# Altium PCB DC-UPS-v1.0.PcbDoc (part 6 of 8)
Units mil, origin at the board's own origin, x right, y up, seen from the top; angles counter-clockwise.
Board outline 5905.51 x 3937.01 mil, 4 copper layers (Top Layer, SIG+PWR, SIG+GND, Bottom Layer), stack 62.449 mil thick; 278 components, 138 nets, 716 pads, 780 vias.
Unrouted connection lines stored in the file: 13.
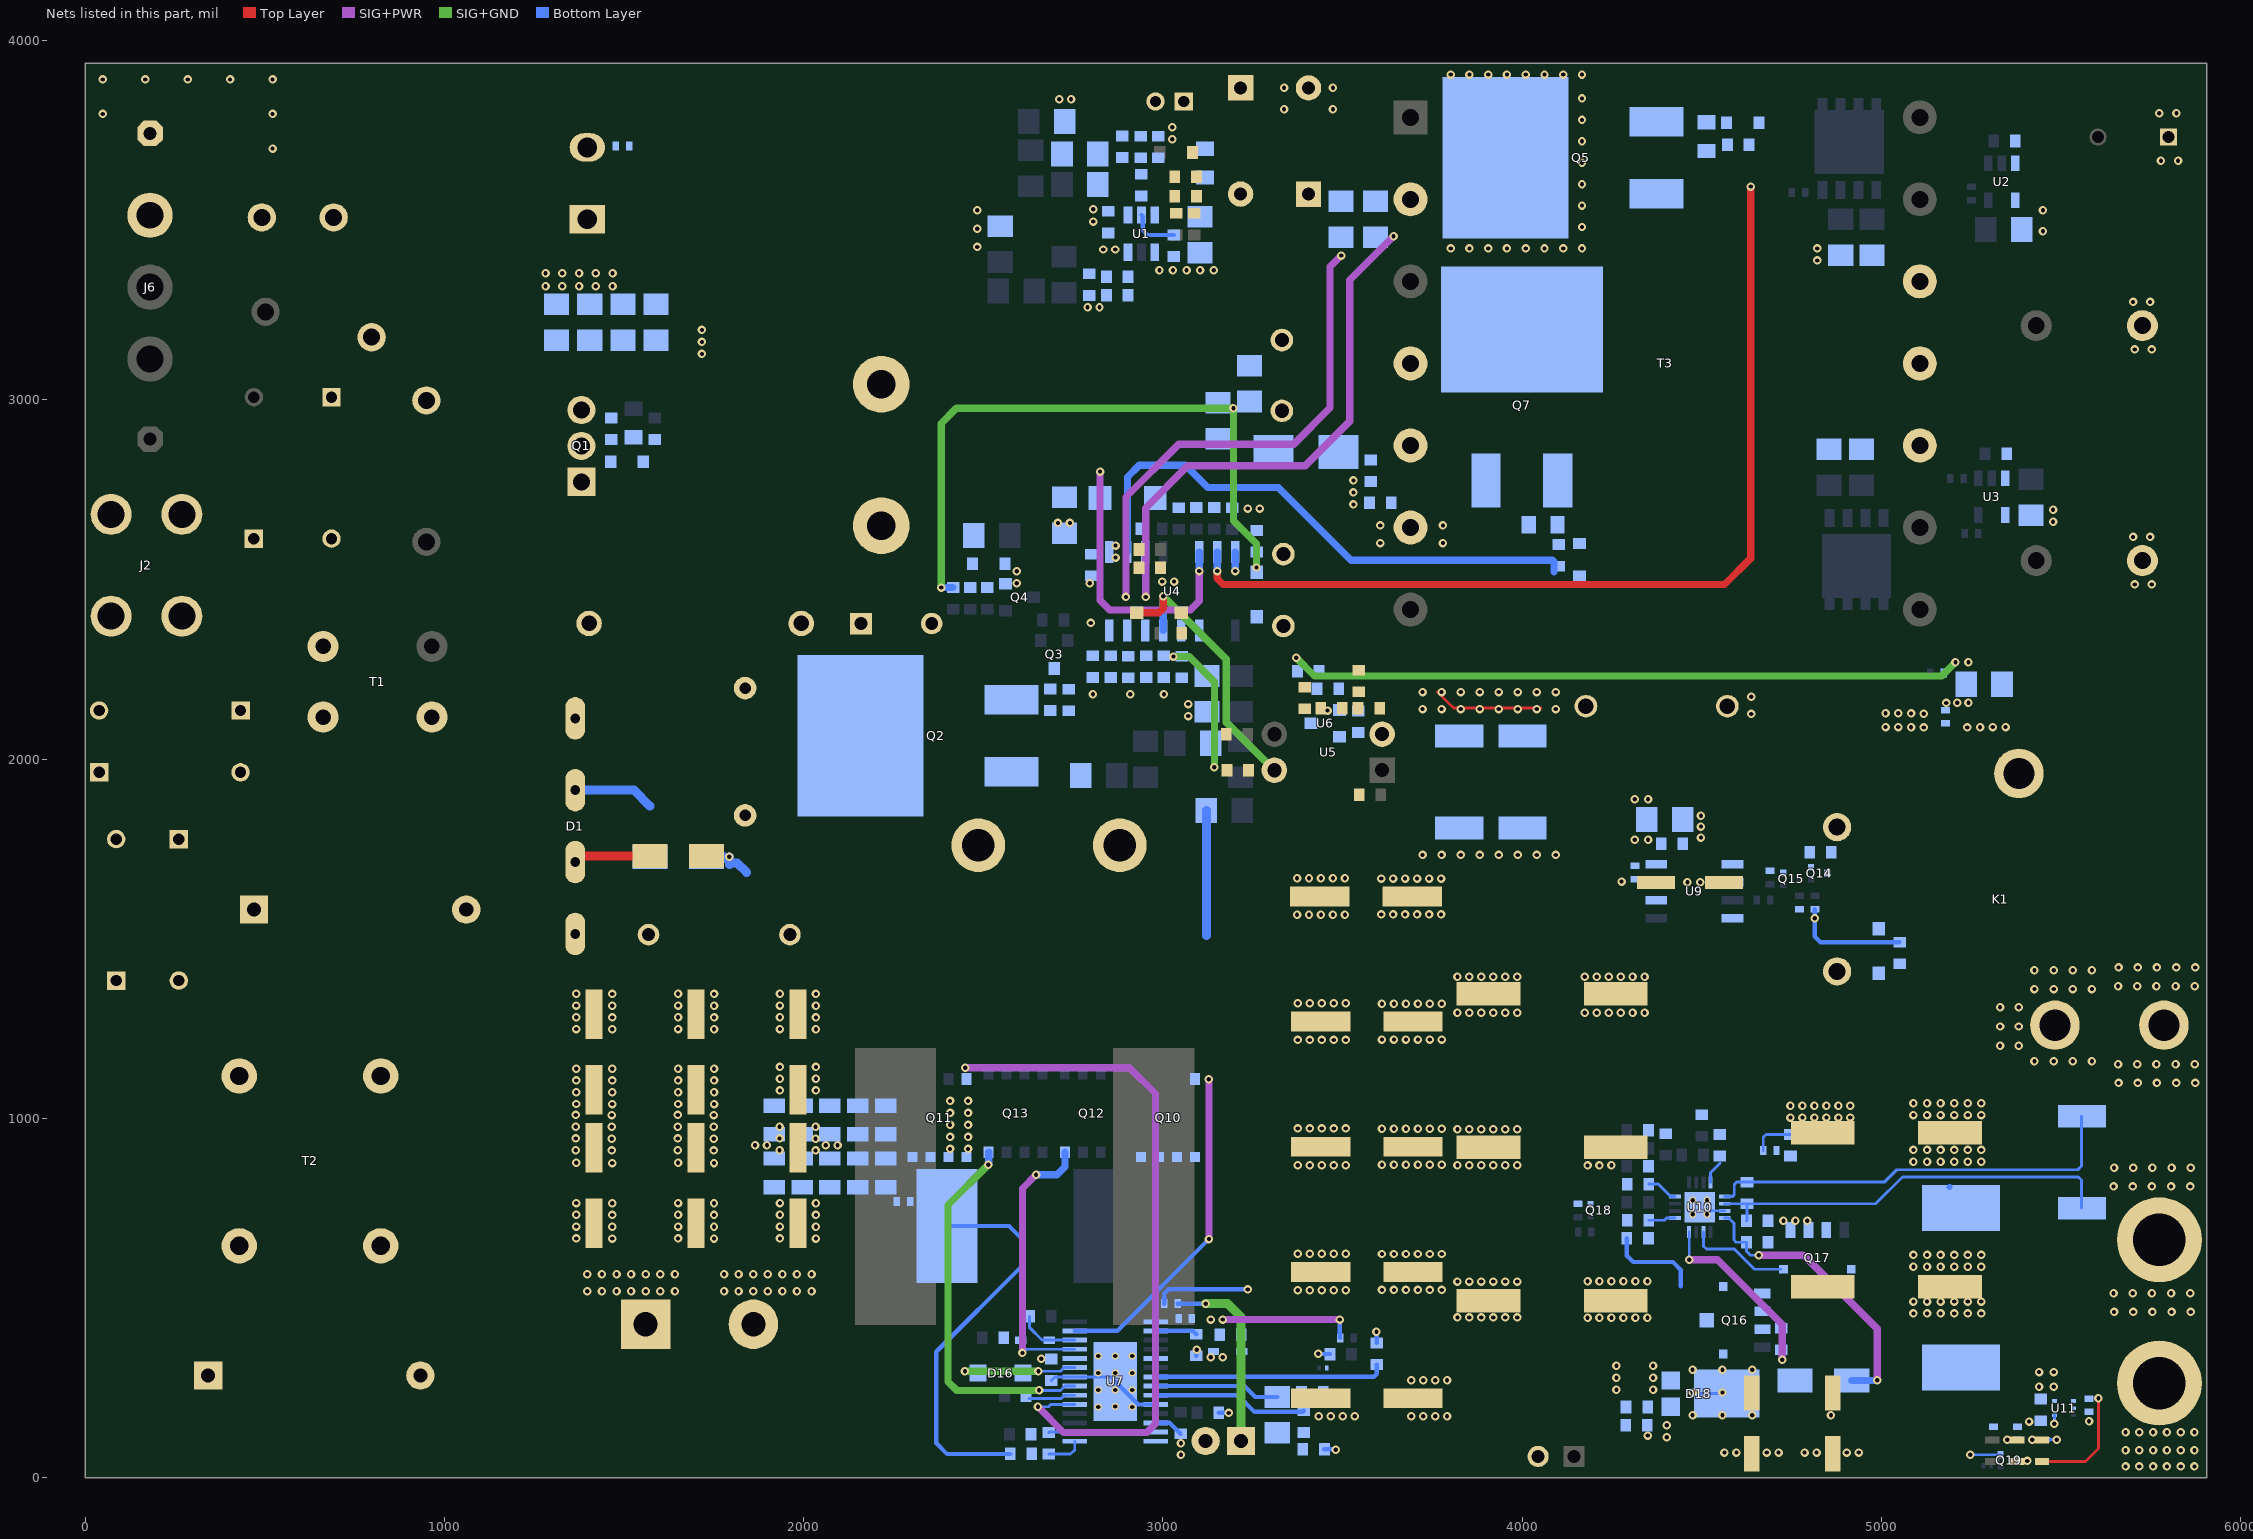
[diagram p4: the nets of this part, all layers, seen from the top]

## Part data (continued)
R71: library part CRCW06035K36FKEA, "RES SMD 5.36K OHM 1% 1/10W 0603", LCSC Part Number=C2076915, Manufacturer=Vishay, Voltage Rating (DC)=75V, ComponentLink1Description=https://datasheet.ciiva.com/3257/dcrcwe3-3257765.pdf?src-supplier=Avnet, ComponentLink1URL=https://datasheet.ciiva.com/3257/dcrcwe3-3257765.pdf?src-supplier=Avnet, ComponentLink2Description=https://datasheet.ciiva.com/5541/dcrcwe3-109170-5541375.pdf?src-supplier=Mouser, ComponentLink2URL=https://datasheet.ciiva.com/5541/dcrcwe3-109170-5541375.pdf?src-supplier=Mouser, ComponentLink3Description=https://datasheet.ciiva.com/16789/70201119-16789112.pdf?src-supplier=Allied+Electronics, ComponentLink3URL=https://datasheet.ciiva.com/16789/70201119-16789112.pdf?src-supplier=Allied+Electronics, ComponentLink4Description=https://datasheet.ciiva.com/7792/125364-7792346.pdf?src-supplier=Element14, ComponentLink4URL=https://datasheet.ciiva.com/7792/125364-7792346.pdf?src-supplier=Element14, ComponentLink5Description=https://datasheet.ciiva.com/7679/1697337-7679125.pdf?src-supplier=Element14, ComponentLink5URL=https://datasheet.ciiva.com/7679/1697337-7679125.pdf?src-supplier=Element14, ComponentLink6Description=https://datasheet.ciiva.com/7679/1697337-7679126.pdf?src-supplier=Element14, ComponentLink6URL=https://datasheet.ciiva.com/7679/1697337-7679126.pdf?src-supplier=Element14, ComponentLink7Description=https://datasheet.ciiva.com/22707/1697337-22707754.pdf?src-supplier=Element14, ComponentLink7URL=https://datasheet.ciiva.com/22707/1697337-22707754.pdf?src-supplier=Element14, Item Type=Resistor, Lead Free=5697LeadFree, Manufacturer Part Number=CRCW06035K36FKEA, Pins=2NUMBER, Pricing="1=0.1, 10=0.017, 50=0.017, 100=0.01, 1000=0.008, 10000=0.004 (USD)", RoHS=Yes, Stock=195980, Supplier=Mouser
R72: library part RC0201FR-0728K7L, "RES 28.7K OHM 1% 1/20W 0201", LCSC Part Number=C138158, Manufacturer=Yageo, Voltage Rating=25V, ComponentLink1Description=https://www.yageo.com/upload/media/product/productsearch/datasheet/rchip/PYu-RC_Group_51_RoHS_L_11.pdf?src-supplier=Digikey, ComponentLink1URL=https://www.yageo.com/upload/media/product/productsearch/datasheet/rchip/PYu-RC_Group_51_RoHS_L_11.pdf?src-supplier=Digikey, ComponentLink2Description=http://www.yageo.com/documents/recent/PYu-RC_Group_51_RoHS_L_10.pdf?src-supplier=Digikey, ComponentLink2URL=http://www.yageo.com/documents/recent/PYu-RC_Group_51_RoHS_L_10.pdf?src-supplier=Digikey, ComponentLink3Description=http://www.yageo.com/documents/recent/PYu-RC_Group_51_RoHS_L_9.pdf?src-supplier=Digikey, ComponentLink3URL=http://www.yageo.com/documents/recent/PYu-RC_Group_51_RoHS_L_9.pdf?src-supplier=Digikey, ComponentLink4Description=https://datasheet.octopart.com/RC0201FR-0728K7L-Yageo-datasheet-164759695.pdf?src-supplier=Future+Electronics, ComponentLink4URL=https://datasheet.octopart.com/RC0201FR-0728K7L-Yageo-datasheet-164759695.pdf?src-supplier=Future+Electronics, Item Type=Resistors, Manufacturer Part Number=RC0201FR-0728K7L, Pricing="1=0.104, 25=0.015, 100=0.008, 250=0.007, 500=0.006 (USD)", RoHS=Yes, Stock=10000, Supplier=Avnet
R75 R77 R87: library part RC0402FR-0710KL, "RES 10K OHM 1% 1/16W 0402", Case Code (Imperial)=0402, Case Code (Metric)=1005, LCSC Part Number=C60490, Manufacturer=Yageo, Max Operating Temperature=155°C, Max Power Dissipation=63mW, Min Operating Temperature=-55°C, Power Rating=62.5mW, Resistance=10kR, Resistance Tolerance=1%, Resistor Type="Thick Film", Supplier Part Number 1=603-RC0402FR-0710KL, Temperature Coefficient=100ppm/°C, Voltage Rating=50V, Case/Package=0402, Category="Chip SMD Resistors", ComponentLink1Description=https://datasheet.ciiva.com/7660/38568-7660787.pdf?src-supplier=Element14, ComponentLink1URL=https://datasheet.ciiva.com/7660/38568-7660787.pdf?src-supplier=Element14, ComponentLink2Description=https://datasheet.ciiva.com/7849/1686128-7849814.pdf?src-supplier=Element14, ComponentLink2URL=https://datasheet.ciiva.com/7849/1686128-7849814.pdf?src-supplier=Element14, ComponentLink3Description=https://datasheet.ciiva.com/7983/1018594-7983486.pdf?src-supplier=Element14, ComponentLink3URL=https://datasheet.ciiva.com/7983/1018594-7983486.pdf?src-supplier=Element14, ComponentLink4Description=https://datasheet.ciiva.com/22747/1018594-22747512.pdf?src-supplier=Element14, ComponentLink4URL=https://datasheet.ciiva.com/22747/1018594-22747512.pdf?src-supplier=Element14, ComponentLink5Description=https://datasheet.ciiva.com/12667/pyu-rc0402-51-rohs-l-6-r-12667067.pdf?src-supplier=Mouser, ComponentLink5URL=https://datasheet.ciiva.com/12667/pyu-rc0402-51-rohs-l-6-r-12667067.pdf?src-supplier=Mouser, ComponentLink6Description=https://datasheet.ciiva.com/7849/1784430-7849813.pdf?src-supplier=Element14, ComponentLink6URL=https://datasheet.ciiva.com/7849/1784430-7849813.pdf?src-supplier=Element14, ComponentLink7Description=https://datasheet.ciiva.com/7849/1784430-7849815.pdf?src-supplier=Element14, ComponentLink7URL=https://datasheet.ciiva.com/7849/1784430-7849815.pdf?src-supplier=Element14, Construction=Rectangular, Depth=0.5mm, Features="Moisture Resistant", Height=0.32mm, Item Type=Resistor, Lead Free="Lead Free", Lead Pitch=0.2mm, Length=1mm, Manufacturer Part Number=RC0402FR-0710KL, Military Standard=Not, Number of Pins=2, Number of Terminations=2, Packaging="Tape and Reel", Pricing 1="1=0.10000, 10=0.01400, 50=0.01400, 100=0.00500, 1000=0.00300, 10000=0.00200 (USD)", REACH SVHC="No SVHC", RoHS=Yes, RoHS Compliant=Yes, Series=RC, Stock 1=18648329, Supplier 1=Mouser, Termination=SMD/SMT, Tolerance=1%, Voltage Rating (DC)=50V, Width=0.5mm, Working Voltage=50V
R76 R78 R88: library part RC0402FR-07100KL, "RES 100K OHM 1% 1/16W 0402", Case Code (Imperial)=0402, Case Code (Metric)=1005, LCSC Part Number=C60491, Manufacturer=Yageo, Max Operating Temperature=155°C, Max Power Dissipation=63mW, Min Operating Temperature=-55°C, Package Quantity=1, Resistance=100kR, Resistance Tolerance=1%, Resistor Type="Thick Film", Supplier Part Number 1=603-RC0402FR-07100KL, Temperature Coefficient=100ppm/°C, Voltage Rating=50V, Case/Package=0402, Category="Chip SMD Resistors", ComponentLink1Description=https://datasheet.ciiva.com/11819/0900766b80c66297-11819452.pdf?src-supplier=RSComponents, ComponentLink1URL=https://datasheet.ciiva.com/11819/0900766b80c66297-11819452.pdf?src-supplier=RSComponents, ComponentLink2Description=https://datasheet.ciiva.com/22747/1018594-22747509.pdf?src-supplier=Element14, ComponentLink2URL=https://datasheet.ciiva.com/22747/1018594-22747509.pdf?src-supplier=Element14, ComponentLink3Description=https://datasheet.ciiva.com/2453/pyu-r-int-thick-7-2453362.pdf?src-supplier=Digi-Key, ComponentLink3URL=https://datasheet.ciiva.com/2453/pyu-r-int-thick-7-2453362.pdf?src-supplier=Digi-Key, ComponentLink4Description=https://datasheet.ciiva.com/2453/pyu-r-int-thick-7-2453363.pdf?src-supplier=Digi-Key, ComponentLink4URL=https://datasheet.ciiva.com/2453/pyu-r-int-thick-7-2453363.pdf?src-supplier=Digi-Key, ComponentLink5Description=https://datasheet.ciiva.com/2453/pyu-r-int-thick-7-2453361.pdf?src-supplier=Digi-Key, ComponentLink5URL=https://datasheet.ciiva.com/2453/pyu-r-int-thick-7-2453361.pdf?src-supplier=Digi-Key, ComponentLink6Description=https://datasheet.ciiva.com/12667/pyu-rc0402-51-rohs-l-6-r-12667930.pdf?src-supplier=Mouser, ComponentLink6URL=https://datasheet.ciiva.com/12667/pyu-rc0402-51-rohs-l-6-r-12667930.pdf?src-supplier=Mouser, ComponentLink7Description=https://datasheet.ciiva.com/15189/getdatasheetpartid-323696-15189334.pdf?src-supplier=Verical, ComponentLink7URL=https://datasheet.ciiva.com/15189/getdatasheetpartid-323696-15189334.pdf?src-supplier=Verical, Construction=Rectangular, Depth=0.5mm, Features="Moisture Resistant", Height=0.016inch, Item Type=Resistor, Lead Free="Lead Free", Length=0.039inch, Manufacturer Part Number=RC0402FR-07100KL, Military Standard=Not, Number of Terminations=2, Packaging="Tape and Reel", Power Rating=63mW, Pricing 1="1=0.10000, 10=0.01200, 50=0.01200, 100=0.00500, 1000=0.00300, 2500=0.00200, 10000=0.00100 (USD)", REACH SVHC="No SVHC", RoHS=Yes, RoHS Compliant=Yes, Series=RC, Stock 1=7759549, Supplier 1=Mouser, Technology="THICK FILM", Termination=SMD/SMT, Tolerance=1%, Width=0.02inch, Working Voltage=50V
R79: library part RT0402BRD0756KL, "RES SMD 56K OHM 0.1% 1/16W 0402", LCSC Part Number=C852845, Manufacturer=Yageo, ComponentLink1Description=https://datasheet.ciiva.com/12721/pyu-rt-1-to-0-05-rohs-l-4-12721243.pdf?src-supplier=Mouser, ComponentLink1URL=https://datasheet.ciiva.com/12721/pyu-rt-1-to-0-05-rohs-l-4-12721243.pdf?src-supplier=Mouser, ComponentLink2Description=https://datasheet.ciiva.com/2582/pyu-rt-1-to-0-05-rohs-l-4-2582430.pdf?src-supplier=Digikey, ComponentLink2URL=https://datasheet.ciiva.com/2582/pyu-rt-1-to-0-05-rohs-l-4-2582430.pdf?src-supplier=Digikey, Item Type=Resistors, Manufacturer Part Number=RT0402BRD0756KL, Pricing="10000=0.0279 (USD)", RoHS=Yes, Stock=70000, Supplier="Arrow Electronics"
R80: library part RC0603FR-072KL, "RES SMD 2K OHM 1% 1/10W 0603", Case Code (Imperial)=0603, Case Code (Metric)=1608, LCSC Part Number=C105576, Manufacturer=Yageo, Max Operating Temperature=155°C, Max Power Dissipation=100mW, Min Operating Temperature=-55°C, Package Quantity=1, Resistance=2kR, Supplier Part Number 1=311-2.00KHRCT-ND, Temperature Coefficient=100ppm/°C, Tolerance=1%, Voltage Rating=50V, Working Voltage=75V, Case/Package=0603, ComponentLink1Description=http://www.farnell.com/datasheets/2167052.pdf?src-supplier=Element14, ComponentLink1URL=http://www.farnell.com/datasheets/2167052.pdf?src-supplier=Element14, ComponentLink2Description=http://documents.rs-components.com/techlib://itc_doclist_GB.htm?stockno=5050139&src-supplier=RSComponents, ComponentLink2URL=http://documents.rs-components.com/techlib://itc_doclist_GB.htm?stockno=5050139&src-supplier=RSComponents, ComponentLink3Description=http://www.yageo.com/documents/recent/PYu-RC_Group_51_RoHS_L_10.pdf?src-supplier=Digi-Key, ComponentLink3URL=http://www.yageo.com/documents/recent/PYu-RC_Group_51_RoHS_L_10.pdf?src-supplier=Digi-Key, ComponentLink4Description=http://www.mouser.com/catalog/specsheets/RC0603.pdf?src-supplier=Mouser, ComponentLink4URL=http://www.mouser.com/catalog/specsheets/RC0603.pdf?src-supplier=Mouser, Composition="Thick Film", Depth=0.8mm, Features="Moisture Resistant", Height=0.45mm, Lead Free="Lead Free", Length=1.6mm, Manufacturer Part Number=RC0603FR-072KL, Military Standard=Not, Number of Pins=2, Number of Terminations=2, Packaging="Tape and Reel", Power Rating=100mW, Pricing 1="1=0.1, 10=0.023, 100=0.0094, 1000=0.00421, 2500=0.00366 (USD)", REACH SVHC="No SVHC", Stock 1=8782961, Supplier 1=Digi-Key, Termination=SMD/SMT, Voltage Rating (DC)=50V, Width=0.031inch
R82 R86 R89: library part RT0603BRD07100KL, "RES SMD 100K OHM 0.1% 1/10W 0603", Case Code (Imperial)=0603, Case Code (Metric)=1608, LCSC Part Number=C122538, Manufacturer=Yageo, Max Operating Temperature=125°C, Max Power Dissipation=100mW, Min Operating Temperature=-55°C, Package Quantity=5000, Resistance=100kR, Supplier Part Number 1=YAG1235CT-ND, Temperature Coefficient=25ppm/°C, Tolerance=0.1%, Voltage Rating=75V, Case/Package=0603, ComponentLink1Description=http://documents.rs-components.com/techlib://itc_doclist_GB.htm?stockno=6174810&src-supplier=RSComponents, ComponentLink1URL=http://documents.rs-components.com/techlib://itc_doclist_GB.htm?stockno=6174810&src-supplier=RSComponents, Composition="Thin Film", Depth=0.8mm, Features="Moisture Resistant", Height=0.022inch, Item Type=Resistor, Lead Free="Lead Free", Length=1.6mm, Manufacturer Part Number=RT0603BRD07100KL, Military Standard=Not, Mount="Surface Mount", Number of Terminations=2, Packaging="Tape and Reel", Power Rating=100mW, Pricing 1="1=0.39, 10=0.332, 100=0.1298, 1000=0.05435, 2500=0.04982 (USD)", Stock 1=53395, Supplier 1=Digi-Key, Termination=SMD/SMT, Voltage Rating (DC)=75V, Width=0.031inch, Working Voltage=75V
R84: library part PA2512FKE7T0R01E, "RES 0.01 OHM 1% 3W 2512", LCSC Part Number=C375691, Manufacturer=Yageo, Item Type=Resistor, Manufacturer Part Number=PA2512FKE7T0R01E, Pricing="1=0.926, 25=0.703, 50=0.63, 100=0.557, 250=0.485 (USD)", RoHS=No, Stock=4000, Supplier=Avnet
R85: library part RT0603BRD0793K1L, "RES SMD 93.1KOHM 0.1% 1/10W 0603", LCSC Part Number=C705799, Manufacturer=Yageo, ComponentLink1Description=http://www.mouser.com/ds/2/447/yageodocoutput-1125656.pdf?src-supplier=Mouser, ComponentLink1URL=http://www.mouser.com/ds/2/447/yageodocoutput-1125656.pdf?src-supplier=Mouser, ComponentLink2Description=http://www.yageo.com/documents/recent/PYu-RT_1-to-0.01_RoHS_L_9.pdf?src-supplier=Digikey, ComponentLink2URL=http://www.yageo.com/documents/recent/PYu-RT_1-to-0.01_RoHS_L_9.pdf?src-supplier=Digikey, ComponentLink3Description=https://www.yageo.com/upload/media/product/productsearch/datasheet/rchip/PYu-RT_1-to-0.01_RoHS_L_12.pdf?src-supplier=Digikey, ComponentLink3URL=https://www.yageo.com/upload/media/product/productsearch/datasheet/rchip/PYu-RT_1-to-0.01_RoHS_L_12.pdf?src-supplier=Digikey, ComponentLink4Description=https://datasheet.octopart.com/RT0603BRD0793K1L-Yageo-datasheet-166250672.pdf?src-supplier=Future+Electronics, ComponentLink4URL=https://datasheet.octopart.com/RT0603BRD0793K1L-Yageo-datasheet-166250672.pdf?src-supplier=Future+Electronics, Item Type=Resistors, Manufacturer Part Number=RT0603BRD0793K1L, Pricing="5000=0.0247, 10000=0.0245 (USD)", RoHS=Yes, Stock=5000, Supplier="Arrow Electronics"
R91 R97: library part RC0402FR-071K5L, "RES 1.5K OHM 1% 1/16W 0402", Case Code (Imperial)=0402, Case Code (Metric)=1005, LCSC Part Number=C114759, Manufacturer=Yageo, Max Operating Temperature=155°C, Max Power Dissipation=63mW, Min Operating Temperature=-55°C, Package Quantity=1, Power Rating=62.5mW, Resistance=1.5kR, Resistance Tolerance=1%, Resistor Type="Thick Film", Supplier Part Number 1=311-1.50KLRCT-ND, Temperature Coefficient=100ppm/°C, Voltage Rating=50V, Case/Package=0402, Category="Chip SMD Resistors", ComponentLink1Description=https://datasheet.ciiva.com/11808/0900766b80c66297-11808238.pdf?src-supplier=RSComponents, ComponentLink1URL=https://datasheet.ciiva.com/11808/0900766b80c66297-11808238.pdf?src-supplier=RSComponents, ComponentLink2Description=https://datasheet.ciiva.com/46394/1018594-46394950.pdf?src-supplier=Element14, ComponentLink2URL=https://datasheet.ciiva.com/46394/1018594-46394950.pdf?src-supplier=Element14, ComponentLink3Description=https://datasheet.ciiva.com/2453/pyu-r-int-thick-7-2453440.pdf?src-supplier=Digi-Key, ComponentLink3URL=https://datasheet.ciiva.com/2453/pyu-r-int-thick-7-2453440.pdf?src-supplier=Digi-Key, ComponentLink4Description=https://datasheet.ciiva.com/2453/pyu-r-int-thick-7-2453441.pdf?src-supplier=Digi-Key, ComponentLink4URL=https://datasheet.ciiva.com/2453/pyu-r-int-thick-7-2453441.pdf?src-supplier=Digi-Key, ComponentLink5Description=https://datasheet.ciiva.com/2453/pyu-r-int-thick-7-2453439.pdf?src-supplier=Digi-Key, ComponentLink5URL=https://datasheet.ciiva.com/2453/pyu-r-int-thick-7-2453439.pdf?src-supplier=Digi-Key, ComponentLink6Description=https://datasheet.ciiva.com/12558/pyu-rc0402-51-rohs-l-6-r-8721-12558542.pdf?src-supplier=Mouser, ComponentLink6URL=https://datasheet.ciiva.com/12558/pyu-rc0402-51-rohs-l-6-r-8721-12558542.pdf?src-supplier=Mouser, ComponentLink7Description=https://datasheet.ciiva.com/7849/1018594-7849863.pdf?src-supplier=Element14, ComponentLink7URL=https://datasheet.ciiva.com/7849/1018594-7849863.pdf?src-supplier=Element14, ComponentLink8Description=https://datasheet.ciiva.com/7849/1018594-7849864.pdf?src-supplier=Element14, ComponentLink8URL=https://datasheet.ciiva.com/7849/1018594-7849864.pdf?src-supplier=Element14, ComponentLink9Description=https://datasheet.ciiva.com/15189/getdatasheetpartid-323992-15189370.pdf?src-supplier=Verical, ComponentLink9URL=https://datasheet.ciiva.com/15189/getdatasheetpartid-323992-15189370.pdf?src-supplier=Verical, Construction=Rectangular, Depth=0.5mm, Features="Moisture Resistant", Height=0.016inch, Lead Free="Lead Free", Length=1mm, Manufacturer Part Number=RC0402FR-071K5L, Military Standard=Not, Number of Terminations=2, Packaging="Tape and Reel", Pricing 1="1=0.10000, 10=0.01500, 100=0.00610, 1000=0.00275, 2500=0.00239, 5000=0.00197 (USD)", REACH SVHC="No SVHC", RoHS=Yes, RoHS Compliant=Yes, Series=RC, Size Code=0402, Stock 1=2832947, Supplier 1=Digi-Key, Technology="THICK FILM", Termination=SMD/SMT, Tolerance=1%, Width=0.02inch
R92: library part RT0603BRE079K31L, "RES SMD 9.31KOHM 0.1% 1/10W 0603", Case/Package=0603, LCSC Part Number=C862329, Manufacturer=Yageo, Max Operating Temperature=155°C, Max Power Dissipation=100mW, Min Operating Temperature=-55°C, Temperature Coefficient=50ppm/°C, Tolerance=0.1%, Voltage Rating (DC)=50V, ComponentLink1Description=https://datasheet.ciiva.com/2584/pyu-rt-1-to-0-05-rohs-l-5-2584666.pdf?src-supplier=Digikey, ComponentLink1URL=https://datasheet.ciiva.com/2584/pyu-rt-1-to-0-05-rohs-l-5-2584666.pdf?src-supplier=Digikey, Item Type=Resistors, Lead Free="Lead Free", Manufacturer Part Number=RT0603BRE079K31L, Number of Terminations=2, Packaging="Tape and Reel", Pricing="5000=0.04446 (USD)", RoHS=Yes, RoHS Compliant=Yes, Series=RT, Supplier=Digikey
R94: library part RT0603BRD07430KL, "RES SMD 430K OHM 0.1% 1/10W 0603", Case Code (Imperial)=0603, Case Code (Metric)=1608, LCSC Part Number=C861400, Manufacturer=Yageo, Max Operating Temperature=125°C, Max Power Dissipation=100mW, Min Operating Temperature=-55°C, Temperature Coefficient=25ppm/°C, Tolerance=0.1%, Voltage Rating=75V, Case/Package=0603, ComponentLink1Description=https://datasheet.ciiva.com/12809/pyu-rt-1-to-0-05-rohs-l-4-12809605.pdf?src-supplier=Mouser, ComponentLink1URL=https://datasheet.ciiva.com/12809/pyu-rt-1-to-0-05-rohs-l-4-12809605.pdf?src-supplier=Mouser, Contact Plating=Tin,Matte, Features="Moisture Resistant", Height=0.022inch, Item Type=Resistors, Length=0.063inch, Manufacturer Part Number=RT0603BRD07430KL, Number of Terminations=2, Packaging="Tape and Reel", Power Rating=100mW, Pricing="1=0.13, 10=0.102, 50=0.081, 100=0.0728, 500=0.0558, 1000=0.04943 (USD)", RoHS=Yes, RoHS Compliant=Yes, Series=RT, Stock=3169, Supplier=Digikey, Termination=SMD/SMT, Weight=7.1E-05oz, Width=0.8mm
R95: library part 0201WMJ0680TEE, "50mW Thick Film Resistors ±5% ±200ppm/℃ 68Ω 0201 Chip Resistor - Surface Mount ROHS", LCSC Part Number=C473576, Manufacturer=UNI-ROYAL, ComponentLink1Description=LCSC, ComponentLink1URL=https://www.lcsc.com/product-detail/Chip-Resistor-Surface-Mount_UNI-ROYAL-Uniroyal-Elec-0201WMJ0680TEE_C473576.html, Item Type=Resistor, Manufacturer Part Number=0201WMJ0680TEE
R96: library part 0201WMF2202TEE, "50mW Thick Film Resistors ±1% ±200ppm/℃ 22kΩ 0201 Chip Resistor - Surface Mount ROHS", LCSC Part Number=C473469, Manufacturer=UNI-ROYAL, Package=0201, ComponentLink1Description=LCSC, ComponentLink1URL=https://www.lcsc.com/product-detail/Chip-Resistor-Surface-Mount_UNI-ROYAL-Uniroyal-Elec-0201WMF2202TEE_C473469.html, Item Type=Resistor, Manufacturer Part Number=0201WMF2202TEE
RT1: library part B57235S0100M000, "ICL 10 OHM 20% 3A 9.5MM", LCSC Part Number=C125456, Manufacturer="TDK EPCOS", ComponentLink1Description=https://datasheet.ciiva.com/15097/getdatasheetpartid-382136-15097842.pdf?src-supplier=Verical, ComponentLink1URL=https://datasheet.ciiva.com/15097/getdatasheetpartid-382136-15097842.pdf?src-supplier=Verical, ComponentLink2Description=https://datasheet.ciiva.com/29386/419728-da-01-en-ntc-sensor-b57235s0100m000-29386966.pdf?src-supplier=Conrad, ComponentLink2URL=https://datasheet.ciiva.com/29386/419728-da-01-en-ntc-sensor-b57235s0100m000-29386966.pdf?src-supplier=Conrad, ComponentLink3Description=https://datasheet.ciiva.com/48779/1899134-48779789.pdf?src-supplier=Element14, ComponentLink3URL=https://datasheet.ciiva.com/48779/1899134-48779789.pdf?src-supplier=Element14, Item Type=Thermistors, Manufacturer Part Number=B57235S0100M000, Pricing="1=0.67, 5=0.646, 10=0.627, 50=0.5274, 100=0.4378, 250=0.398, 500=0.33828, 1000=0.29848, 5000=0.27638 (USD)", RoHS=Yes, Stock=17669, Supplier=Digikey
T1: "CMC 1MH 3A 2LN TH", Manufacturer="Wurth Electronics", Supplier Part Number=732-1439-ND, ComponentLink1Description=https://datasheet.ciiva.com/4952/744822301-91864-4952415.pdf?src-supplier=Mouser, ComponentLink1URL=https://datasheet.ciiva.com/4952/744822301-91864-4952415.pdf?src-supplier=Mouser, ComponentLink2Description=https://datasheet.ciiva.com/11796/0900766b804ac271-11796688.pdf?src-supplier=Rs, ComponentLink2URL=https://datasheet.ciiva.com/11796/0900766b804ac271-11796688.pdf?src-supplier=Rs, ComponentLink3Description=https://datasheet.ciiva.com/7211/70388-7211253.pdf?src-supplier=Newark, ComponentLink3URL=https://datasheet.ciiva.com/7211/70388-7211253.pdf?src-supplier=Newark, ComponentLink4Description=https://datasheet.ciiva.com/7754/1736520-7754735.pdf?src-supplier=Element14, ComponentLink4URL=https://datasheet.ciiva.com/7754/1736520-7754735.pdf?src-supplier=Element14, ComponentLink5Description=https://datasheet.ciiva.com/6216/744822301-6216281.pdf?src-supplier=Digikey, ComponentLink5URL=https://datasheet.ciiva.com/6216/744822301-6216281.pdf?src-supplier=Digikey, Item Type=Inductor, Manufacturer Part Number=744822301, Pricing="1=4.57, 10=4.5, 50=3.57, 140=3.41, 280=3.1 (USD)", RoHS=Yes, Stock=1589, Supplier=Digikey
T2: "CMC 10MH 3A 2LN TH", Case/Package=L, Current=3A, DC Resistance (DCR)=105mR, Inductance Tolerance=30%, Manufacturer="Wurth Electronics", Max Operating Temperature=125°C, Min Operating Temperature=-40°C, Package Quantity=200, Supplier Part Number=732-1452-ND, Test Frequency=10kHz, ComponentLink1Description=https://datasheet.ciiva.com/11796/0900766b804acf58-11796710.pdf?src-supplier=Rs, ComponentLink1URL=https://datasheet.ciiva.com/11796/0900766b804acf58-11796710.pdf?src-supplier=Rs, ComponentLink2Description=https://datasheet.ciiva.com/4952/744824310-39306-4952431.pdf?src-supplier=Mouser, ComponentLink2URL=https://datasheet.ciiva.com/4952/744824310-39306-4952431.pdf?src-supplier=Mouser, ComponentLink3Description=https://datasheet.ciiva.com/6214/744824310-6214810.pdf?src-supplier=Digikey, ComponentLink3URL=https://datasheet.ciiva.com/6214/744824310-6214810.pdf?src-supplier=Digikey, ComponentLink4Description=https://datasheet.ciiva.com/7211/70411-7211262.pdf?src-supplier=Newark, ComponentLink4URL=https://datasheet.ciiva.com/7211/70411-7211262.pdf?src-supplier=Newark, ComponentLink5Description=https://datasheet.ciiva.com/7754/1736534-7754741.pdf?src-supplier=Element14, ComponentLink5URL=https://datasheet.ciiva.com/7754/1736534-7754741.pdf?src-supplier=Element14, ComponentLink6Description=https://datasheet.ciiva.com/48690/001088035-da-01-ml-we-cmb-stromkomp-netzdrossel-74482-de-en-48690603.pdf?src-supplier=Conrad, ComponentLink6URL=https://datasheet.ciiva.com/48690/001088035-da-01-ml-we-cmb-stromkomp-netzdrossel-74482-de-en-48690603.pdf?src-supplier=Conrad, Current Rating=3A, Depth=18.5mm, Height=33mm, Item Type="Common Mode Chokes", Lead Free="Lead Free", Lead Pitch=10mm, Length=27.5mm, Manufacturer Part Number=744824310, Max DC Current=3A, Mounting Technology="Through Hole,Radial", Number of Lines=2, Packaging=Bulk, Pins=4, Pricing="1=5.63, 10=5.54, 100=4.39, 250=4.2, 500=3.82 (USD)", Reach SVHC Compliant=No, RoHS=Yes, RoHS Compliant=Yes, Series=WE-CMB, Stock=278, Supplier=Digikey, Termination=Radial, Tolerance=30%, Width=18.5mm
T3: "XFMR RES CONV AC/DC 500UH TH", Current Rating=16.7A, Frequency=120kHz, Manufacturer="Wurth Electronics", Max Operating Temperature=125°C, Min Operating Temperature=-40°C, Output Voltage=12V, Package Quantity=15, Power Rating=200W, Supplier Part Number=732-5065-ND, ComponentLink1Description=https://datasheet.ciiva.com/24142/760895631-270540-24142135.pdf?src-supplier=Mouser, ComponentLink1URL=https://datasheet.ciiva.com/24142/760895631-270540-24142135.pdf?src-supplier=Mouser, ComponentLink2Description=https://datasheet.ciiva.com/29632/760895631-29632478.pdf?src-supplier=Digikey, ComponentLink2URL=https://datasheet.ciiva.com/29632/760895631-29632478.pdf?src-supplier=Digikey, Height=30mm, Item Type=Transformer, Length=44mm, Manufacturer Part Number=760895631, Mounting Technology="Through Hole", Output Current=16.7A, Packaging=Tray, Pricing="1=18.84, 10=18.057, 50=16.928, 100=15.235, 500=13.54202 (USD)", RoHS=Yes, RoHS Compliant=Yes, Series=WE-LLCR, Shielding=Unshielded, Stock=19, Supplier=Digikey, Termination=Solder, Width=36mm
TP1 TP2: "-", Manufacturer Part Number="Th Hole Test Point", Item Type="Test Point"
U1: "IC PFC CTRLR TRANSITION SOT23-6", LCSC Part Number=C2868631, Manufacturer="Texas Instruments", Package=SOT-23-6, ComponentLink1Description=LCSC, ComponentLink1URL=https://www.lcsc.com/product-detail/AC-DC-Controllers-Regulators_Texas-Instruments-UCC28056DBVT_C2868631.html, Item Type=IC, Manufacturer Part Number=UCC28056DBVT
U2 U3: "SYNC RECTIFIER FLYBACK", LCSC Part Number=C471044, Manufacturer="Texas Instruments", ComponentLink1Description=http://www.ti.com/general/docs/suppproductinfo.tsp?distId=10&amp;gotoUrl=http%3A%2F%2Fwww.ti.com%2Flit%2Fgpn%2Fucc24612&src-supplier=Digikey, ComponentLink1URL=http://www.ti.com/general/docs/suppproductinfo.tsp?distId=10&amp;gotoUrl=http%3A%2F%2Fwww.ti.com%2Flit%2Fgpn%2Fucc24612&src-supplier=Digikey, Height=1.45mm, Item Type=IC, Length=2.9mm, Manufacturer Part Number=UCC24612-2DBVR, Pins=5NUMBER, Pricing="1=0.92, 10=0.758, 50=0.758, 100=0.575, 1000=0.392, 10000=0.317 (USD)", RoHS=Yes, Stock=6284, Supplier=Mouser, Thickness=1.2mm, Width=1.6mm
U4: "HALF BRIDGE CONT WITH HV DRIVER", LCSC Part Number=C2867939, Manufacturer="Texas Instruments", ComponentLink1Description=http://www.ti.com/general/docs/suppproductinfo.tsp?distId=10&amp;gotoUrl=http%3A%2F%2Fwww.ti.com%2Flit%2Fgpn%2Fucc256402&src-supplier=Digikey, ComponentLink1URL=http://www.ti.com/general/docs/suppproductinfo.tsp?distId=10&amp;gotoUrl=http%3A%2F%2Fwww.ti.com%2Flit%2Fgpn%2Fucc256402&src-supplier=Digikey, Item Type=IC, Manufacturer Part Number=UCC256404DDBR, Pricing="1=2.34, 10=1.99, 50=1.99, 100=1.69, 1000=1.15, 10000=0.981 (USD)", RoHS=Yes, Stock=2756, Supplier=Mouser
U5: "Optocoupler DC-IN 1-CH Transistor DC-OUT 4-Pin PDIP", LCSC Part Number=C142630, Manufacturer="Vishay Semiconductors", ComponentLink1Description=https://datasheet.ciiva.com/26941/getdatasheetpartid-641306-26941970.pdf?src-supplier=Verical, ComponentLink1URL=https://datasheet.ciiva.com/26941/getdatasheetpartid-641306-26941970.pdf?src-supplier=Verical, ComponentLink2Description=https://datasheet.ciiva.com/2087/vo618a-2087569.pdf?src-supplier=Digikey, ComponentLink2URL=https://datasheet.ciiva.com/2087/vo618a-2087569.pdf?src-supplier=Digikey, ComponentLink3Description=https://datasheet.ciiva.com/8086/vo618a-8086102.pdf?src-supplier=Avnet, ComponentLink3URL=https://datasheet.ciiva.com/8086/vo618a-8086102.pdf?src-supplier=Avnet, Item Type=Optocouplers, Manufacturer Part Number=VO618A-3, Pricing="1=0.46, 10=0.283, 100=0.1626, 1000=0.12726, 2000=0.11666, 5000=0.10605, 10000=0.09898, 25000=0.09544 (USD)", RoHS=Yes, Stock=6419, Supplier=Digikey
U6: "IC VREF SHUNT ADJ 1% SOT23-3", LCSC Part Number=C109228, Manufacturer="Texas Instruments", Supplier Part Number=595-TLVH431AQDBZR, ComponentLink1Description=https://datasheet.ciiva.com/2006/tlvh431a-2006852.pdf?src-supplier=Digikey, ComponentLink1URL=https://datasheet.ciiva.com/2006/tlvh431a-2006852.pdf?src-supplier=Digikey, ComponentLink2Description=https://datasheet.ciiva.com/2006/tlvh431a-2006853.pdf?src-supplier=Digikey, ComponentLink2URL=https://datasheet.ciiva.com/2006/tlvh431a-2006853.pdf?src-supplier=Digikey, ComponentLink3Description=https://datasheet.ciiva.com/2006/tlvh431a-2006854.pdf?src-supplier=Digikey, ComponentLink3URL=https://datasheet.ciiva.com/2006/tlvh431a-2006854.pdf?src-supplier=Digikey, ComponentLink4Description=https://datasheet.ciiva.com/30001/tlvh432b-30001871.pdf?src-supplier=Avnet, ComponentLink4URL=https://datasheet.ciiva.com/30001/tlvh432b-30001871.pdf?src-supplier=Avnet, Item Type=IC, Manufacturer Part Number=TLVH431AQDBZR, Pricing="1=0.7, 10=0.576, 50=0.576, 100=0.437, 1000=0.297, 10000=0.23 (USD)", RoHS=Yes, Stock=64111, Supplier=Mouser
U7: "IC POWER REGULATOR", LCSC Part Number=C2860809, Manufacturer="Texas Instruments", Item Type=IC, Manufacturer Part Number=LM5176QPWPRQ1, Pricing="1=5.61, 10=5.37, 50=5.24, 100=4.96, 1000=4.47, 10000=4.4 (USD)", RoHS=Yes, Stock=7665, Supplier=Mouser
U9: "IC OSC SGL TIMER 100KHZ 8-SOIC", LCSC Part Number=C128415, Manufacturer="Texas Instruments", ComponentLink1Description=https://datasheet.ciiva.com/22713/1737034-22713893.pdf?src-supplier=Element14, ComponentLink1URL=https://datasheet.ciiva.com/22713/1737034-22713893.pdf?src-supplier=Element14, ComponentLink2Description=https://datasheet.ciiva.com/46384/1874740-46384605.pdf?src-supplier=Element14, ComponentLink2URL=https://datasheet.ciiva.com/46384/1874740-46384605.pdf?src-supplier=Element14, ComponentLink3Description=https://datasheet.ciiva.com/1233/sa555-1233083.pdf?src-supplier=Digikey, ComponentLink3URL=https://datasheet.ciiva.com/1233/sa555-1233083.pdf?src-supplier=Digikey, ComponentLink4Description=https://datasheet.ciiva.com/1233/sa555-1233129.pdf?src-supplier=Digikey, ComponentLink4URL=https://datasheet.ciiva.com/1233/sa555-1233129.pdf?src-supplier=Digikey, ComponentLink5Description=https://datasheet.ciiva.com/1233/sa555-1233130.pdf?src-supplier=Digikey, ComponentLink5URL=https://datasheet.ciiva.com/1233/sa555-1233130.pdf?src-supplier=Digikey, ComponentLink6Description=https://datasheet.ciiva.com/14274/se555m-14274506.pdf?src-supplier=Avnet, ComponentLink6URL=https://datasheet.ciiva.com/14274/se555m-14274506.pdf?src-supplier=Avnet, Item Type=IC, Lead Free=5697LeadFree, Manufacturer Part Number=NA555DR, Pricing="1=0.41, 10=0.303, 50=0.303, 100=0.172, 1000=0.123, 10000=0.104 (USD)", RoHS=Yes, Stock=11620, Supplier=Mouser, Thickness=1.58mm
U10: "IC BATT CHG LI-ION 1-6CEL 16VQFN", LCSC Part Number=C157568, Manufacturer="Texas Instruments", ComponentLink1Description=https://datasheet.ciiva.com/1934/bq24600-1934848.pdf?src-supplier=Digikey, ComponentLink1URL=https://datasheet.ciiva.com/1934/bq24600-1934848.pdf?src-supplier=Digikey, ComponentLink2Description=https://datasheet.ciiva.com/15115/getdatasheetpartid-517716-15115134.pdf?src-supplier=Verical, ComponentLink2URL=https://datasheet.ciiva.com/15115/getdatasheetpartid-517716-15115134.pdf?src-supplier=Verical, ComponentLink3Description=https://datasheet.ciiva.com/3214/bq24600-3214303.pdf?src-supplier=Avnet, ComponentLink3URL=https://datasheet.ciiva.com/3214/bq24600-3214303.pdf?src-supplier=Avnet, Item Type=IC, Manufacturer Part Number=BQ24600RVAR, Pricing="1=1.88, 10=1.69, 50=1.69, 100=1.36, 1000=0.928, 10000=0.8 (USD)", RoHS=Yes, Stock=3970, Supplier=Mouser
U11: "Active Low 1 VSOF-5 Monitors & Reset Circuits ROHS", Case/Package=VSOF, LCSC Part Number=C2067200, Manufacturer=Rohm, Max Operating Temperature=105°C, Max Power Dissipation=210mW, Max Reset Threshold Voltage=6.09V, Max Supply Current=1.98uA, Max Supply Voltage=10V, Min Operating Temperature=-40°C, Min Reset Threshold Voltage=5.91V, Min Supply Voltage=1.2V, Number of Voltages Monitored=1, Operating Supply Current=900nA, Package Quantity=3000, Supplier Part Number 1=1717448, Threshold Voltage=6V, Accuracy=1%, Category="Voltage Supervisors", ComponentLink1Description=https://datasheet.ciiva.com/1974/bd48xxg-e-1974994.pdf?src-supplier=Digi-Key, ComponentLink1URL=https://datasheet.ciiva.com/1974/bd48xxg-e-1974994.pdf?src-supplier=Digi-Key, ComponentLink2Description=https://datasheet.ciiva.com/8133/bd48xxg-e-8133113.pdf?src-supplier=Avnet, ComponentLink2URL=https://datasheet.ciiva.com/8133/bd48xxg-e-8133113.pdf?src-supplier=Avnet, ComponentLink3Description=LCSC, ComponentLink3URL=https://www.lcsc.com/product-detail/Monitors-Reset-Circuits_ROHM-Semicon-BD4830FVE-TR_C2067200.html, Item Type=IC, Lead Free="Lead Free", Manufacturer Part Number=BD4830FVE-TR, Mounting Technology="Surface Mount", Number of Monitored Inputs=1, Packaging="Tape and Reel", Pins=5, Pricing 1="1=0.64000, 10=0.54900, 25=0.51200, 100=0.40960, 250=0.38032, 500=0.32182, 1000=0.24868 (USD)", Reset="Active Low", RoHS=Yes, RoHS Compliant=Yes, Series=BD48xxx, Stock 1=5990, Supplier 1=Rs, Type="Simple Reset/Power-On Reset,Voltage Detector", Watchdog Timer=No
VR1: "VARISTOR 430V 3.5KA DISC 10MM", Case/Package=Radial, Clamping Current=25A, Clamping Voltage=710V, Flammability Rating=5813Flammability, LCSC Part Number=C210564, Manufacturer="TDK EPCOS", Max Operating Temperature=85°C, Max Surge Current=3.5kA, Max Varistor Voltage=473V, Max Voltage Rating (AC)=275V, Max Voltage Rating (DC)=350V, Min Operating Temperature=-40°C, Min Varistor Voltage=387V, Power Rating=400mW, Tolerance=10%, Varistor Voltage=430V, ComponentLink1Description=http://www.farnell.com/datasheets/1680955.pdf?src-supplier=Farnell, ComponentLink1URL=http://www.farnell.com/datasheets/1680955.pdf?src-supplier=Farnell, ComponentLink2Description=http://www.farnell.com/datasheets/2311597.pdf?src-supplier=Farnell, ComponentLink2URL=http://www.farnell.com/datasheets/2311597.pdf?src-supplier=Farnell, ComponentLink3Description=http://components.arrow.com/part/dataview/30869957S9461734N9769?src-supplier=Arrow+Electronics, ComponentLink3URL=http://components.arrow.com/part/dataview/30869957S9461734N9769?src-supplier=Arrow+Electronics, ComponentLink4Description=http://www.farnell.com/datasheets/1680955.pdf?src-supplier=Element14, ComponentLink4URL=http://www.farnell.com/datasheets/1680955.pdf?src-supplier=Element14, ComponentLink5Description=http://www.farnell.com/datasheets/2311597.pdf?src-supplier=Newark, ComponentLink5URL=http://www.farnell.com/datasheets/2311597.pdf?src-supplier=Newark, ComponentLink6Description=http://datasheet.octopart.com/B72210S2271K101-EPCOS-datasheet-11546246.pdf?src-supplier=Distrelec, ComponentLink6URL=http://datasheet.octopart.com/B72210S2271K101-EPCOS-datasheet-11546246.pdf?src-supplier=Distrelec, ComponentLink7Description=https://en.tdk.eu/inf/70/db/var/SIOV_Leaded_AdvanceD.pdf?src-supplier=Digikey, ComponentLink7URL=https://en.tdk.eu/inf/70/db/var/SIOV_Leaded_AdvanceD.pdf?src-supplier=Digikey, ComponentLink8Description=https://datasheet.octopart.com/S10K275E2-EPCOS-datasheet-5104.pdf?src-supplier=Future+Electronics, ComponentLink8URL=https://datasheet.octopart.com/S10K275E2-EPCOS-datasheet-5104.pdf?src-supplier=Future+Electronics, ComponentLink9Description=http://datasheet.octopart.com/B72210S2271K101-EPCOS-datasheet-11546246.pdf?src-supplier=Mouser, ComponentLink9URL=http://datasheet.octopart.com/B72210S2271K101-EPCOS-datasheet-11546246.pdf?src-supplier=Mouser, ComponentLink10Description=https://datasheet.octopart.com/B72210S2271K101-EPCOS-datasheet-11546246.pdf?src-supplier=Newark, ComponentLink10URL=https://datasheet.octopart.com/B72210S2271K101-EPCOS-datasheet-11546246.pdf?src-supplier=Newark, ComponentLink11Description=http://datasheet.octopart.com/B72210S2271K101-EPCOS-datasheet-11546246.pdf?src-supplier=Avnet, ComponentLink11URL=http://datasheet.octopart.com/B72210S2271K101-EPCOS-datasheet-11546246.pdf?src-supplier=Avnet, ComponentLink12Description=http://www.epcos.com/inf/70/db/var_08/SIOV_Leaded_StandarD.pdf?src-supplier=Future+Electronics, ComponentLink12URL=http://www.epcos.com/inf/70/db/var_08/SIOV_Leaded_StandarD.pdf?src-supplier=Future+Electronics, ComponentLink13Description=http://datasheet.octopart.com/B72210S2271K101-EPCOS-datasheet-11546246.pdf?src-supplier=Verical, ComponentLink13URL=http://datasheet.octopart.com/B72210S2271K101-EPCOS-datasheet-11546246.pdf?src-supplier=Verical, ComponentLink14Description=http://datasheet.octopart.com/B72210S2271K101-EPCOS-datasheet-11546246.pdf?src-supplier=TME, ComponentLink14URL=http://datasheet.octopart.com/B72210S2271K101-EPCOS-datasheet-11546246.pdf?src-supplier=TME, ComponentLink15Description=http://datasheet.octopart.com/B72210S2271K101-EPCOS-datasheet-11546246.pdf?src-supplier=TTI, ComponentLink15URL=http://datasheet.octopart.com/B72210S2271K101-EPCOS-datasheet-11546246.pdf?src-supplier=TTI, ComponentLink16Description=http://datasheet.octopart.com/B72210S2271K101-EPCOS-datasheet-11546246.pdf?src-supplier=Rutronik, ComponentLink16URL=http://datasheet.octopart.com/B72210S2271K101-EPCOS-datasheet-11546246.pdf?src-supplier=Rutronik, Contact Plating=154ConductorMaterial, Current Rating=25A, Depth=5.4mm, Diameter=12mm, Energy=55J, ESD Protection=5898YesNo, Height=14.5mm, Item Type=Varistors, Lead Pitch=7.5mm, Lead/Base Style=Radial, Manufacturer Part Number=B72210S2271K101, Material=4240ConductorMaterial, Mounting Technology="Through Hole", Number of Circuits=1, Packaging=Bulk, Pricing="1=0.12365, 10=0.12192, 30=0.12018, 50=0.11845, 100=0.11671 (USD)", Radiation Hardening=5898YesNo, Reach SVHC Compliant=Unknown, RoHS=Yes, RoHS Compliant=Yes, Series=AdvanceD, Stock=5700, Supplier=Avnet, Termination=4745ConnectorType, Voltage Rating=350V, Voltage Rating (AC)=275V, Voltage Rating (DC)=350V, Voltage Tolerance=10%, Weight=2.000002g

## Via types
v1: diameter 23.62, hole 11.81, Top Layer to Bottom Layer, 767 vias
v2: diameter 19.69, hole 11.81, Top Layer to Bottom Layer, 12 vias
v3: diameter 23.62, hole 11.81, Top Layer to Bottom Layer, tented both sides, 1 vias

## Nets (pads, with @x,y where several pads share a name; then routed paths per layer and width w, separated by ;. In a path a pad name is that pad's centre, name@x,y a point inside that pad or via, vN(x,y) a via of type N, cw(c..) or ccw(c..) an arc to the next point about the centre after c; other vN are vias at no path point)
12V: C89.2 C90.2 C92.1 D17.2 D18.1 D18.3 K1.3 K1.4 R51.2 R52.2 R75.2 R79.2 R80.2 R91.2 R97.2 U9.4 U9.8
  other v1: 4401.86,112.41 4401.86,145.75 5425.38,1158.7 5478.74,1158.7 5532.1,1158.7 5585.45,1158.7 5329.6,1202.23 5381.86,1202.23 5329.6,1255.58 5381.86,1255.58 5329.6,1308.94 5381.86,1308.94 5425.38,1359.74 5478.74,1359.74 5532.1,1359.74 5585.45,1359.74 5425.38,1412 5478.74,1412 5532.1,1412 5585.45,1412 3722.48,1733 3775.45,1733 3828.41,1733 3881.38,1733 3934.35,1733 3987.32,1733 4040.29,1733 4093.26,1733 4313,1775.5 4350,1775.5 4313,1888.33 4350,1888.33
12V#: C24.2 C26.1 C27.1 C31.1 C32.1 C33.1 C35.1 C36.1 C37.2 C41.2 C43.2 R50.2 R51.1 R52.1 T3.10 T3.11 T3.12 U2.4 U3.4 | length 305.7
  Top Layer w8: v1@3764,2186.49 3808.55,2141.93 v1@4051.26,2141.93
  other v1: 4637,2125.51 3722.48,2139 3775.45,2139 3828.41,2139 3881.38,2139 3934.35,2139 3987.32,2139 4040.29,2139 4093.26,2139 4637,2173 3722.48,2186.49 3775.45,2186.49 3828.41,2186.49 3881.38,2186.49 3934.35,2186.49 3987.32,2186.49 4040.29,2186.49 4093.26,2186.49 5704.15,2485.85 5751.64,2485.85 5699.64,2618.15 5747.12,2618.15 5477,2660.67 5477,2694 5704.15,3139.85 5751.64,3139.85 5699.64,3272.15 5747.12,3272.15 4821,3387.67 4821,3421 5449,3468.5 5449,3527 5777.51,3664.85 5825,3664.85 5773,3797.15 5820.49,3797.15
12V-OUT: C64.2 C65.2 C66.2 C67.2 C68.2 C69.2 C70.2 C71.2 C72.2 C73.2 C75.2 C80.1 C81.1 C82.1 C83.1 C84.1 C85.1 J7.1 Q11.5 Q11.6 Q11.7 Q11.8 R60.2 U7.12 U7.24 | length 81.7
  Bottom Layer w12: U7.12@2980,152.6 3018.4,152.6 R60.2@3049,122
  other v1: 3050,63.67 3050,96 2661,331 1398,519 1438.61,519 1479.22,519 1519.83,519 1560.44,519 1601.06,519 1641.67,519 1398,566 1438.61,566 1479.22,566 1519.83,566 1560.44,566 1601.06,566 1641.67,566 1367,876.17 1467,875.65 1650.5,876.17 1750.5,875.65 1366.02,911.24 1466.02,910.72 1649.52,911.24 1749.52,910.72 1933.02,911.24 2033.02,910.72 2407.54,914.96 2457.54,914.96 1864.83,925.02 1897.65,925.02 2061.72,925 2094.54,925 1366.02,943.99 1466.02,943.54 1649.52,943.99 1749.52,943.54 1933.02,943.99 2033.02,943.54 2407.54,948.3 2457.54,948.3 1466.02,976.35 1749.52,976.35 2033.02,976.35 1366.02,976.74 1649.52,976.74 1933.02,976.74 2407.54,981.63 2457.54,981.63 1366.02,1009.49 1466.02,1009.17 1649.52,1009.49 1749.52,1009.17 2407.54,1014.96 2457.54,1014.96 1367.02,1039.92 1467.02,1039.72 1650.52,1039.92 1750.52,1039.72 2407.54,1048.3 2457.54,1048.3 1367.02,1072.67 1467.02,1072.54 1650.52,1072.67 1750.52,1072.54 1934.02,1077.67 2034.02,1077.54 1367.02,1105.42 1467.02,1105.35 1650.52,1105.42 1750.52,1105.35 1934.02,1110.42 2034.02,1110.35 1367.02,1138.17 1467.02,1138.17 1650.52,1138.17 1750.52,1138.17 1934.02,1143.17 2034.02,1143.17
BAT: C101.1 C102.1 C103.1 C104.2 C107.2 K1.5 R84.2 R86.2 R95.2 TP1.1 U10.9 U11.5 | length 1208.2
  Bottom Layer w8: U10.9@4562.9,782.02 4584.25,782.02 4589.76,787.54 4589.76,816.16 4595.94,822.34 C103.1@4625.34,822.34 5007.55,822.34 5042.22,857 5546,857 5556,867 R84.2@5556,1005.91 ; R95.2@5463.29,106.02 5463.43,105.88 5487.31,105.88 v1(5487.45,105.74)
  other v1: 5438.31,252.9 5479.24,252.9 5438.31,293.83 5479.24,293.83 5088.66,457 5126.4,457 5164.13,457 5201.86,457 5239.6,457 5277.33,457 5647.05,461.22 5700.4,461.22 5753.76,461.22 5807.11,461.22 5860.47,461.22 5088.67,490 5126.4,490 5164.13,490 5201.87,490 5239.6,490 5277.33,490 5645.47,513.48 5698.83,513.48 5752.18,513.48 5805.54,513.48 5858.9,513.48 5088.67,587 5126.4,587 5164.13,587 5201.87,587 5239.6,587 5277.33,587 5088.66,620 5126.4,620 5164.13,620 5201.86,620 5239.6,620 5277.33,620 5645.47,810.52 5698.83,810.52 5752.18,810.52 5805.54,810.52 5858.9,810.52 5647.05,862.78 5700.4,862.78 5753.76,862.78 5807.11,862.78 5860.47,862.78 5088.66,879 5126.4,879 5164.13,879 5201.86,879 5239.6,879 5277.33,879 5088.67,912 5126.4,912 5164.13,912 5201.87,912 5239.6,912 5277.33,912 5088.67,1009 5126.4,1009 5164.13,1009 5201.87,1009 5239.6,1009 5277.33,1009 5088.66,1042 5126.4,1042 5164.13,1042 5201.86,1042 5239.6,1042 5277.33,1042 5659.57,1098.45 5712.93,1098.45 5766.29,1098.45 5819.64,1098.45 5873,1098.45 5658,1150.71 5711.36,1150.71 5764.71,1150.71 5818.07,1150.71 5871.43,1150.71 5658,1367.74 5711.36,1367.74 5764.71,1367.74 5818.07,1367.74 5871.43,1367.74 5659.57,1420 5712.93,1420 5766.29,1420 5819.64,1420 5873,1420
BUCK-BOOST-IN: C59.1 C60.1 C61.1 C62.1 C63.1 C109.1 C110.1 C111.1 D14.1 K1.1 Q10.5 Q10.6 Q10.7 Q10.8 R59.2 R61.2 | length 378
  SIG+PWR w20: v1(3166.33,440) 3490,440 v1@3492,438
  Bottom Layer w12: v1(3492,440) 3492,390.33 R61.2@3493.33,389
  other v1: 3690.8,271 3724.13,271 3757.46,271 3790.8,271 3133,335 3166.33,335 3133,440 3819.33,445.77 3852.67,445.77 3886,445.77 3919.33,445.77 3952.67,445.77 3986,445.77 3609.4,522.44 3642.73,522.44 3676.07,522.44 3709.4,522.44 3742.73,522.44 3776.07,522.44 3819.33,545.77 3852.67,545.77 3886,545.77 3919.33,545.77 3952.67,545.77 3986,545.77 3609.4,622.44 3642.73,622.44 3676.07,622.44 3709.4,622.44 3742.73,622.44 3776.07,622.44 3819.33,869.77 3852.67,869.77 3886,869.77 3919.33,869.77 3952.67,869.77 3986,869.77 3609.4,870.77 3642.73,870.77 3676.07,870.77 3709.4,870.77 3742.73,870.77 3776.07,870.77 3819.33,969.77 3852.67,969.77 3886,969.77 3919.33,969.77 3952.67,969.77 3986,969.77 3609.4,970.77 3642.73,970.77 3676.07,970.77 3709.4,970.77 3742.73,970.77 3776.07,970.77 3609.4,1219.11 3642.73,1219.11 3676.07,1219.11 3709.4,1219.11 3742.73,1219.11 3776.07,1219.11 3819.33,1293.77 3852.67,1293.77 3886,1293.77 3919.33,1293.77 3952.67,1293.77 3986,1293.77 3609.4,1319.11 3642.73,1319.11 3676.07,1319.11 3709.4,1319.11 3742.73,1319.11 3776.07,1319.11 3819.33,1393.77 3852.67,1393.77 3886,1393.77 3919.33,1393.77 3952.67,1393.77 3986,1393.77 3607.15,1567.44 3640.48,1567.44 3673.82,1567.44 3707.15,1567.44 3740.48,1567.44 3773.82,1567.44 3607.15,1667.44 3640.48,1667.44 3673.82,1667.44 3707.15,1667.44 3740.48,1667.44 3773.82,1667.44
CSG: NT4.1 R68.1 R74.1 | length 1106.8
  Bottom Layer w12: R68.1@2399,700.25 2571.75,700.25 2605,667 2605,586.43 2369,350.43 2369,96.22 2399.22,66 R74.1@2575,66
DC-GND: C7.1 C8.1 C14.1 C19.1 C20.2 C21.1 C22.1 C23.1 C24.1 C28.1 C34.1 C38.2 C39.1 C45.2 C46.2 C47.1 C48.1 C49.1 C50.1 C51.1 C53.1 C54.1 C55.1 C56.1 C58.1 D1.4 D6.2 Q2.3 Q4.2 Q7.3 R9.1 R13.1 R14.1 R15.1 R16.1 R21.1 R24.1 R25.1 R26.1 R29.1 R33.1 R47.1 R48.1 R49.1 R57.1 RT1.1 T3.6 U1.4 U4.11
  other v1: 3070,2119.67 3070,2153 2805,2180.25 2909,2180.25 3002.6,2180.25 2593,2489 2796,2489 2997.67,2494 3031,2494 2593,2522.33 3605,2600.86 3779,2600.86 3605,2650 3779,2650 3235.67,2697 3269,2697 2790,3257 2823.33,3257 1281.67,3316 1328.33,3316 1375,3316 1421.67,3316 1468.33,3316 1281.67,3352 1328.33,3352 1375,3352 1421.67,3352 1468.33,3352 2990,3360 3027.75,3360 3065.5,3360 3103.25,3360 3141,3360 2833.67,3418 2867,3418
EARTH: C1.1 C2.1 C3.1 C9.2 C10.2 C11.2 J2.1
GND: C59.2 C60.2 C61.2 C62.2 C63.2 C64.1 C65.1 C66.1 C67.1 C68.1 C69.1 C70.1 C71.1 C72.1 C73.1 C74.1 C75.1 C77.1 C79.1 C80.2 C81.2 C82.2 C83.2 C84.2 C85.2 C87.1 C89.1 C90.1 C92.2 C93.2 C94.2 C95.2 C96.2 C97.1 C99.1 C100.1 C101.2 C102.2 C105.2 C106.2 C107.1 C108.1 C109.2 C110.2 C111.2 J4.2 J5.2 J7.2 NT3.1 NT4.2 Q14.2 Q15.2 Q17.1 Q17.2 Q17.3 Q18.2 Q19.2 R65.1 R67.1 R70.1 R71.1 R72.1 R76.1 R78.1 R85.1 R88.1 R89.1 R90.1 R94.1 TP2.1 U7.5 U7.10 U7.13 U7.14 U7.22 U7.29 U9.1 U10.11 U10.17 U11.2 U11.4 | length 1246.9
  Bottom Layer w8: C75.1@2689,270.25 2699.3,280.55 U7.22@2754.35,280.55 2854.39,280.55 U7.29@2867.18,267.76 ; U10.17@4513.69,732.81 4523.53,742.65 U10.11@4562.9,742.65 ; v1(5247,64) 5247.25,63.75 Q19.2@5330.72,63.75 ; v1@5480.73,150.61 U11.4@5480.73,174
  Bottom Layer w12: U7.29@2867.18,267.76 2931.16,203.78 U7.10@2980,203.78 ; R65.1@3003.5,484.25 3003.5,512.63 3014.94,524.06 3235.94,524.06 v1(3236,524) ; C74.1@3093,339.25 3093,355 v1(3094,356) ; R67.1@3155,181 3182,181 v1(3183,180) ; v1(3432,345) 3433,344 R70.1@3464.83,344 ; C79.1@3445.75,237 3477,237 3478,238 ; R71.1@3449.22,79 3480,79 v1(3481,78) ; v1(3594,406) 3594.83,405.17 C87.1@3594.83,375 ; R76.1@4814,1582 v1(4814,1556.91) 4814,1506 4830,1490 C89.1@5050,1490
  other v1: 5678.94,31.25 5717.28,31.25 5755.61,31.25 5793.94,31.25 5832.28,31.25 5870.61,31.25 4562.67,70 4596,70 4680,70 4713.33,70 4785.67,70 4819,70 4903,70 4936.33,70 5678.94,76.25 5717.28,76.25 5755.61,76.25 5793.94,76.25 5832.28,76.25 5870.61,76.25 4349,117 5678.94,126.25 5717.28,126.25 5755.61,126.25 5793.94,126.25 5832.28,126.25 5870.61,126.25 5480.31,150.19 5410.31,156.19 5577.31,157.19 3433.54,171 3466.87,171 3500.2,171 3533.54,171 3690.8,171 3724.13,171 3757.46,171 3790.8,171 4262,244.83 4364,244.83 4262,278.17 4364,278.17 4262,311.5 4364,311.5 4181.5,444.77 4214.83,444.77 4248.17,444.77 4281.5,444.77 4314.83,444.77 4348.16,444.77 1778.33,519 1818.94,519 1859.56,519 1900.17,519 1940.78,519 1981.39,519 2022,519 3375.31,521.44 3408.64,521.44 3441.98,521.44 3475.31,521.44 3508.64,521.44 4181.5,546.77 4214.83,546.77 4248.17,546.77 4281.5,546.77 4314.83,546.77 4348.16,546.77 1778.33,566 1818.94,566 1859.56,566 1900.17,566 1940.78,566 1981.39,566 2022,566 3375.31,623.44 3408.64,623.44 3441.98,623.44 3475.31,623.44 3508.64,623.44 1467,665.41 1750.5,665.41 2034,665.41 1367,665.93 1650.5,665.93 1934,665.93 1467,698.23 1750.5,698.23 2034,698.23 1367,698.68 1650.5,698.68 1934,698.68 4726.67,715 4760,715 4793.33,715 1367,731.43 1467,731.04 1650.5,731.43 1750.5,731.04 1934,731.43 2034,731.04 1367,764.18 1467,763.86 1650.5,764.18 1750.5,763.86 1934,764.18 2034,763.86 4181.5,868.77 4214.83,868.77 4248.17,869.31 3375.31,869.77 3408.64,869.77 3441.98,869.77 3475.31,869.77 3508.64,869.77 3375.31,971.77 3408.64,971.77 3441.98,971.77 3475.31,971.77 3508.64,971.77 4746.34,1002 4779.67,1002 4813,1002 4846.34,1002 4879.67,1002 4913,1002 4746.33,1035 4779.67,1035 4813,1035 4846.33,1035 4879.67,1035 4913,1035 3375.31,1218.11 3408.64,1218.11 3441.98,1218.11 3475.31,1218.11 3508.64,1218.11 1367.02,1248.4 1467.02,1247.89 1650.52,1248.4 1750.52,1247.89 1934.02,1248.4 2034.02,1247.89 1367.02,1281.15 1467.02,1280.7 1650.52,1281.15 1750.52,1280.7 1934.02,1281.15 2034.02,1280.7 4173.66,1293.77 4207,1293.77 4240.33,1293.77 4273.66,1293.77 4307,1293.77 4340.33,1293.77 1367.02,1313.9 1467.02,1313.52 1650.52,1313.9 1750.52,1313.52 1934.02,1313.9 2034.02,1313.52 3375.31,1320.11 3408.64,1320.11 3441.98,1320.11 3475.31,1320.11 3508.64,1320.11 1467.02,1346.33 1750.52,1346.33 2034.02,1346.33 1367.02,1346.65 1650.52,1346.65 1934.02,1346.65 4173.66,1393.77 4207,1393.77 4240.33,1393.77 4273.66,1393.77 4307,1393.77 4340.33,1393.77 3373.06,1566.44 3406.39,1566.44 3439.72,1566.44 3473.06,1566.44 3506.39,1566.44 4276.19,1659 3373.06,1668.44 3406.39,1668.44 3439.72,1668.44 3473.06,1668.44 3506.39,1668.44 4497,1781.5 4497,1811.91 4497,1842.33 5082.02,2088.48 5117.52,2087.95 5238.48,2087.95 5273.98,2088.48 5011,2089 5046.51,2089 5309.49,2089 5345,2089 5117.52,2126.25 5011,2127.3 5046.51,2127.3 5082.02,2126.78
  other v2: 2819.93,196.89 2914.42,196.89 2867.18,197.76 2819.93,244.14 2867.18,244.14 2914.42,244.14 2819.93,291.38 2867.18,291.38 2914.42,291.38 2819.93,338.63 2867.18,338.63 2914.42,338.63
HDRV1: Q10.4 U7.27 | length 924.2
  SIG+PWR w20: v1(3127.5,1108.5) 3128,1108 v1(3128,664)
  Bottom Layer w12: U7.27@2754.35,408.51 2872.51,408.51 v1(3128,664)
HDRV2: Q11.4 U7.19 | length 1949
  SIG+PWR w20: v1(2450,1141) 2907,1141 2979,1069 2979,150 2955,126 2723.35,126 v1(2652.16,197.19)
  Bottom Layer w8: v1(2652.16,197.19) 2681.19,197.19 2687.78,203.78 U7.19@2754.35,203.78
INDUC: L1.1 NT1.1
LDRV1: Q12.4 U7.25 | length 791.5
  SIG+PWR w20: v1(2609,347) 2609,805.1 v1(2646.81,842.91)
  Bottom Layer w8: v1(2609,347) 2619.33,357.33 U7.25@2754.35,357.33